# Altium PCB FMU3_REV_G.PcbDoc (part 3 of 4)
Units mm, origin at the board's own origin, x right, y up, seen from the top; angles counter-clockwise.
Board outline 34.01 x 34.03 mm, 8 copper layers (Top, GND_top, HorizontalTop, Verticall_top, Horizontal_bot, VerticalBot, GND_BOT, Bottom), stack 1.63 mm thick; 169 components, 248 nets, 852 pads, 426 vias.
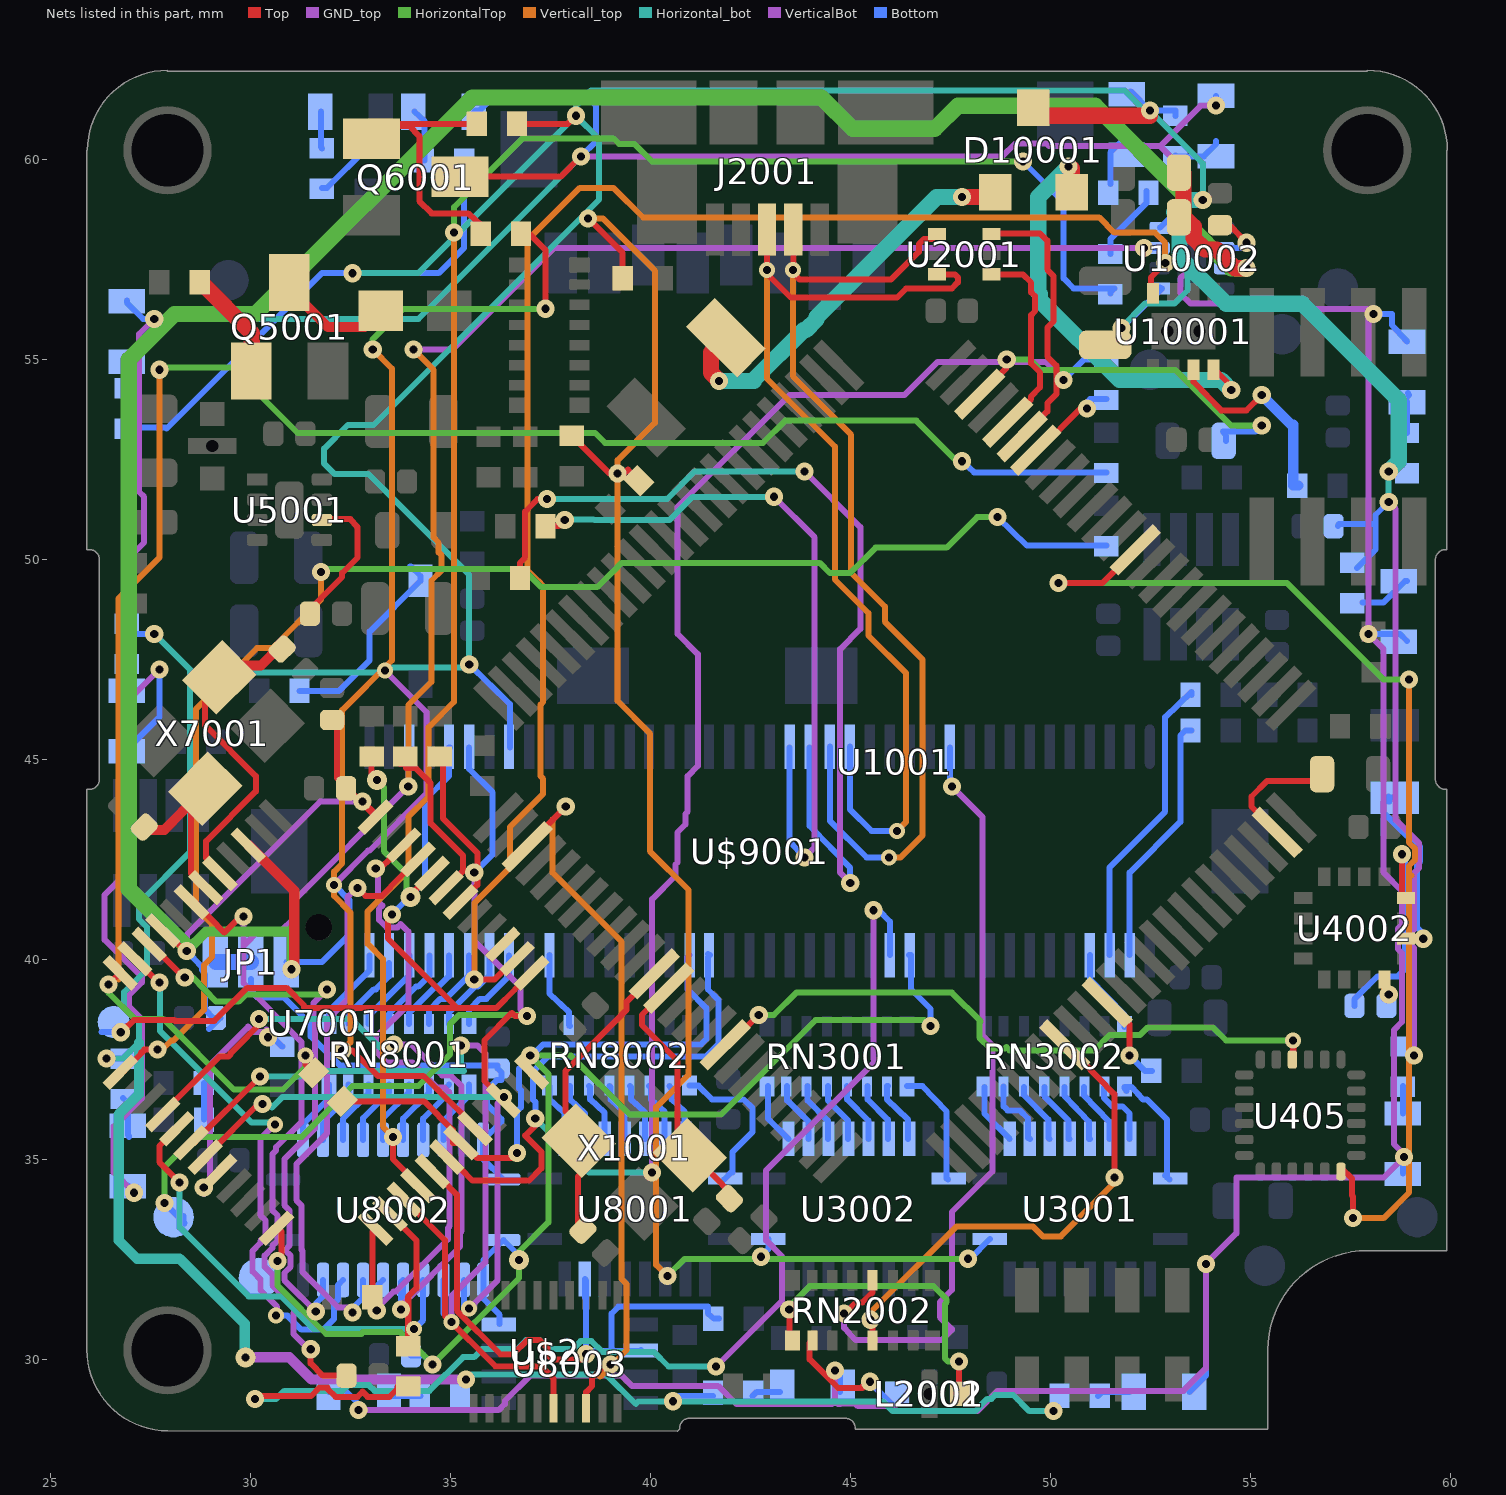
[diagram p9: the nets of this part, all layers, seen from the top]

## Via types
v1: diameter 0.453/0.453/0.453/0.453/0.453/0.453/0.453/0.453 (per signal layer), hole 0.203, Top to Bottom, tented both sides, 178 vias
v2: diameter 0.453/0.453/0.453/0.453 (per signal layer), hole 0.203, Top to Verticall_top, tented both sides, 116 vias
v3: diameter 0.453/0.453/0.453/0.453 (per signal layer), hole 0.203, Horizontal_bot to Bottom, tented both sides, 94 vias
v4: diameter 0.4, hole 0.2, Top to Verticall_top, tented both sides, 8 vias
v5: diameter 0.4, hole 0.2, Horizontal_bot to Bottom, tented both sides, 8 vias
v6: diameter 0.45, hole 0.2, Horizontal_bot to Bottom, tented bottom, 4 vias
v7: diameter 0.5, hole 0.2, Top to Verticall_top, tented both sides, 4 vias
v8: diameter 0.4, hole 0.2, Top to Bottom, tented bottom, 2 vias
v9: diameter 0.453/0.453/0.453/0.453/0.453/0.453/0.453/0.453 (per signal layer), hole 0.203, Top to Bottom, tented top, 2 vias
v10: diameter 0.5, hole 0.2, Horizontal_bot to Bottom, tented both sides, 2 vias
v11: diameter 0.453/0.453/0.453/0.453 (per signal layer), hole 0.203, Horizontal_bot to Bottom, tented bottom, 1 vias
v12: diameter 0.45, hole 0.2, Top to Verticall_top, tented top, 1 vias
v13: diameter 0/0/0/0/0/0 (per signal layer), hole 0.66, HorizontalTop to Bottom, tented bottom, 1 vias
v14: diameter 0.5, hole 0.2, Top to Bottom, tented both sides, 1 vias
v15: diameter 0.4, hole 0.2, Top to Bottom, tented both sides, 1 vias
v16: diameter 0.453/0.453/0.453/0.453/0.453/0.453/0.453/0.453 (per signal layer), hole 0.203, Top to Bottom, tented bottom, 1 vias
v17: diameter 0.453/0.453/0.453/0.453 (per signal layer), hole 0.203, Top to Verticall_top, tented top, 1 vias
v18: diameter 0.5, hole 0.2, HorizontalTop to Bottom, tented both sides, 1 vias

## Nets (pads, with @x,y where several pads share a name; then routed paths per layer and width w, separated by ;. In a path a pad name is that pad's centre, name@x,y a point inside that pad or via, vN(x,y) a via of type N, cw(c..) or ccw(c..) an arc to the next point about the centre after c; other vN are vias at no path point) (continued)
I2C_1_SCL: R3007.P$2 U$9001.37 | length 18.5
  Top w0.15: R3007.P$2@37.363,50.825 37.694,50.825 v1(37.846,50.978)
  Horizontal_bot w0.15: v1(37.846,50.978) 37.867,50.999 38.567,50.999 38.588,50.978 40.462,50.978 41.046,51.562 v3(43.078,51.562)
  VerticalBot w0.15: v3(43.078,51.562) 44.094,50.546 44.094,42.799 v3(43.84,42.545)
  Bottom w0.15: U$9001.37@43.459,45.288 43.459,42.951 v3(43.84,42.545)
I2C_1_SDA: R3008.P$2 U$9001.35 | length 24.1
  Top w0.15: R3008.P$2@36.728,49.53 36.728,49.911 36.855,50.038 36.855,51.156 36.855,51.194 37.168,51.507 v1(37.401,51.507)
  Horizontal_bot w0.15: v1(37.401,51.507) 40.407,51.507 41.097,52.197 42.266,52.197 v3(43.84,52.197)
  VerticalBot w0.15: v3(43.84,52.197) 45.237,50.8 45.237,48.26 44.729,47.752 44.729,42.164 v3(44.983,41.91)
  Bottom w0.15: U$9001.35@43.967,45.288 43.967,43.332 44.983,42.291 v3(44.983,41.91)
I2C_2_SCL: R3005.P$2 U$9001.6 | length 7.5
  Bottom w0.15: U$9001.6@51.46,40.107 51.46,42.291 52.857,43.688 52.857,46.05 53.518,46.685 R3005.P$2@53.518,46.609
I2C_2_SDA: R3006.P$2 U$9001.4 | length 6.3
  Bottom w0.15: U$9001.4@51.968,40.107 51.968,42.164 53.238,43.434 53.238,45.593 53.365,45.72 R3006.P$2@53.518,45.72
I/O_POWER_BREATHING: R6001.P$2 U7001.32 | length 29.9
  Top w0.15: v2(32.283,37.719) 32.537,37.719 33.172,37.084 34.315,37.084 35.611,35.814 U7001.32@35.611,35.789 ; R6001.P$2@36.754,58.141 36.957,58.141 37.363,57.734 v2(37.363,56.261)
  HorizontalTop w0.15: v2(33.045,55.245) 33.045,55.499 33.807,56.261 v2(37.363,56.261)
  Verticall_top w0.15: v2(32.283,37.719) 32.487,37.922 32.487,41.173 32.08,41.58 32.08,42.189 32.283,42.393 32.283,46.228 33.528,47.473 33.528,54.762 v2(33.045,55.245)
I\O\-\L\E\D\_\A\M\B\E\R\: R6015.P$1 U7001.28 | length 45.9
  Top w0.15: v2(33.553,35.56) 33.553,35.001 U7001.28@34.188,34.366
  HorizontalTop w0.15: v2(35.077,58.166) 35.077,58.801 36.8,60.524 39.064,60.524 39.208,60.38 39.583,60.38 39.589,60.386 40.03,59.944 v1(49.301,59.944)
  Verticall_top w0.15: v2(33.553,35.56) 33.299,35.814 33.299,40.005 32.918,40.386 32.918,41.199 33.934,42.215 33.934,43.561 34.442,44.069 34.442,45.802 35.077,46.437 v2(35.077,58.166)
  Bottom w0.15: v1(49.301,59.944) 50.317,58.928 50.317,57.023 50.571,56.769 51.587,56.769 51.486,56.667 R6015.P$1@51.486,56.642
I\O\-\L\E\D\_\S\A\F\E\T\_\P\R\O\T\: R6016.P$1 U$9001.28 | length 31.8
  Top w0.152: v1(30.099,29.007) 30.173,29.081 31.505,29.081 31.714,29.29 31.911,29.29 31.911,29.267 32.118,29.06 32.665,29.06 32.791,29.187 32.918,29.06 33.465,29.06 33.672,29.267 33.672,29.32 R6016.P$1@33.934,29.32
  Horizontal_bot w0.15: v1(30.099,29.007) 30.632,29.007 30.836,29.21 32.286,29.21 32.43,29.354 32.949,29.354 33.093,29.21 34.462,29.21 35.304,30.052 35.583,30.052 35.783,30.251 36.655,30.251 36.881,30.478 37.22,30.478 37.446,30.251 38.045,30.251 38.244,30.451 38.515,30.451 38.781,30.185 40.074,30.185 40.44,29.82 v3(41.631,29.82)
  VerticalBot w0.15: v3(41.631,29.82) 43.277,31.466 43.277,32.573 42.88,32.97 42.88,34.721 45.618,37.46 45.568,37.51 v3(45.568,41.224)
  Bottom w0.15: v3(45.568,41.224) 45.695,41.224 45.974,40.945 U$9001.28@45.974,40.107
I\O\-\L\E\D\_\S\A\F\E\T\Y\: R6016.P$2 U7001.26 | length 3.7
  Top w0.15: U7001.26@33.475,33.68 U7001.26@33.477,33.68
  Top w0.152: U7001.26@33.475,33.635 34.138,32.973 34.138,31.775 33.934,31.572 R6016.P$2@33.934,30.328
IMU_TEMPERATURE_CONTROL: U7001.27 U$2.9 | length 7.4
  Top w0.15: U7001.27@33.835,33.994 34.849,32.98 34.849,31.088 36.115,29.822 37.265,29.822 37.435,29.652 37.435,29.646 37.567,29.515 U$2.9@37.567,28.776
IO-!RESET: C7001.P$2 U7001.7 U10002.3 U$9001.75 | length 54.4
  Top w0.15: U7001.7@28.524,41.453 28.524,41.377 28.651,41.377 29.337,40.665 29.743,41.072 v1(29.82,41.072) ; v1(31.496,30.251) 31.496,29.896 31.801,29.591 C7001.P$2@32.309,29.591
  Verticall_top w0.15: v16@33.934,44.298 33.934,46.355 34.514,46.935 34.514,49.469 34.768,49.723 34.768,50.099 34.696,50.17 34.696,50.419 34.569,50.546 34.569,54.737 v1(34.061,55.245)
  VerticalBot w0.15: v1(29.82,41.072) 29.82,40.341 30.201,40.722 30.769,40.722 31.041,40.994 31.041,41.429 v16(33.934,44.323) ; v1(31.496,30.251) 31.445,30.251 31.069,30.628 31.069,31.15 31.087,31.169 31.087,31.303 30.536,31.854 30.536,32.124 30.342,32.317 30.342,32.587 30.536,32.781 30.536,32.835 30.67,32.97 30.67,33.592 30.536,33.727 30.536,35.125 30.632,35.222 30.632,35.306 31.267,35.941 31.267,37.928 29.816,39.405 29.82,39.827 ; v1(34.061,55.245) 35.043,55.245 37.583,57.785 v3(52.324,57.785) ; 29.82,39.827 29.81,40.35 29.81,39.837 29.82,39.827
  Bottom w0.15: v16(33.934,44.323) 33.934,45.263 U$9001.75@33.96,45.288 ; v3(52.324,57.785) U10002.3@52.73,57.785
IO-!VDD_SERVO_IN_FAULT: U7001.38 U10001.4 | length 39.2
  Top w0.15: v2(35.585,39.497) 36.093,39.497 36.627,40.03 U7001.38@36.652,40.03 ; U10001.4@52.578,56.667 52.502,56.744 52.502,57.048 v2(52.857,57.404)
  Verticall_top w0.15: v2(35.585,39.497) 35.585,41.402 36.474,42.291 36.474,43.302 37.308,44.135 37.308,44.511 37.243,44.576 37.243,46.366 37.308,46.431 37.308,49.331 37.181,49.458 37.176,49.458 36.911,49.723 36.911,57.972 38.225,59.286 39.062,59.286 39.802,58.547 47.777,58.547 51.206,58.547 51.587,58.166 52.603,58.166 52.857,57.912 v2(52.857,57.404)
IO-BOOT0: R7001.P$1 U7001.44 | length 5.2
  Top w0.15: R7001.P$1@33.02,45.068 33.02,44.399 33.147,44.526 v7(33.147,44.475) ; v7(33.985,41.554) 33.985,41.599 U7001.44@34.529,42.143
  HorizontalTop w0.15: v7(33.147,44.475) 33.325,44.298 33.325,42.703 33.886,42.141 33.886,41.455 v7(33.985,41.554)
IO-BOOT1: R7002.P$1 U7001.20 | length 6.6
  Top w0.15: v1(28.823,34.292) 28.823,34.309 U7001.20@29.235,34.722
  VerticalBot w0.15: v1@28.823,34.131 v1(28.823,34.292) ; v1@28.911,34.22 28.981,34.29 28.981,37.363 29.932,38.314 30.065,38.18 30.336,38.18 30.393,38.237 30.429,38.202 v3(30.429,38.049)
  Bottom w0.15: v3(30.429,38.049) 30.497,38.117 30.48,38.117 R7002.P$1@30.785,37.813
IO-CH1: U7001.10 U8002.10 | length 15.3
  Top w0.15: U7001.10@27.483,40.386 28.346,39.522 v2(28.346,39.548)
  HorizontalTop w0.15: v2(28.346,39.548) 28.55,39.548 29.134,38.938 29.693,38.938 29.87,39.116 31.775,39.116 v1(31.902,39.243)
  VerticalBot w0.15: v3@31.715,31.099 30.836,31.979 30.836,32.157 30.995,32.317 30.995,32.587 30.854,32.729 30.97,32.846 30.97,33.717 30.836,33.851 30.836,35.001 31.598,35.764 31.598,38.474 31.567,38.505 31.567,38.908 v1(31.902,39.243)
  Bottom w0.15: v3(31.623,31.191) 31.623,31.394 31.803,31.575 U8002.10@31.803,31.981
IO-CH1-PROT: RN8001.9 U$9001.80 | length 2.1
  Bottom w0.15: RN8001.9@31.953,38.379 31.953,38.71 32.969,39.726 U$9001.80@32.969,40.097
IO-CH2: U7001.11 U8002.9 | length 14.2
  Top w0.15: U7001.11@27.127,40.03 27.127,39.98 27.686,39.421 v1(27.711,39.421)
  Horizontal_bot w0.15: v1(27.711,39.421) 27.732,39.4 27.732,38.202 30.019,35.916 30.632,35.916 30.632,35.907 v5(30.597,35.872)
  VerticalBot w0.15: v5(30.597,35.872) 30.236,35.51 30.236,33.603 30.37,33.468 30.37,33.094 30.236,32.959 30.236,32.905 30.042,32.712 30.042,32.193 30.236,31.999 30.236,31.73 30.658,31.308 30.658,31.115 v5(30.632,31.09)
  Bottom w0.15: v5(30.632,31.09) 30.912,31.09 31.263,30.738 31.811,30.738 32.076,31.004 32.076,31.379 32.068,31.386 32.182,31.5 32.182,31.86 U8002.9@32.303,31.981
IO-CH2-PROT: RN8001.10 U$9001.78 | length 2
  Bottom w0.15: RN8001.10@32.436,38.379 32.436,38.608 33.073,39.245 33.123,39.245 33.452,39.574 U$9001.78@33.452,39.903
IO-CH3: U7001.45 U8002.8 | length 15
  Top w0.15: v1(32.664,41.783) 32.868,41.58 33.274,41.58 U7001.45@34.188,42.52
  VerticalBot w0.15: v3(32.537,31.166) 32.41,31.293 32.182,31.293 31.295,32.179 31.295,32.712 31.27,32.737 31.27,33.841 31.136,33.976 31.136,34.877 31.898,35.64 31.898,38.477 32.41,38.989 32.41,41.554 v1(32.664,41.783)
  Bottom w0.15: v3@32.569,31.166 32.569,31.134 v3(32.537,31.166) 32.537,31.255 32.569,31.286 32.563,31.293 32.803,31.533 U8002.8@32.803,31.981
IO-CH3-PROT: RN8001.11 U$9001.76 | length 2.1
  Bottom w0.15: RN8001.11@32.944,38.379 32.944,38.584 33.96,39.6 U$9001.76@33.96,40.097
IO-CH4: U7001.46 U8002.7 | length 15.9
  Top w0.15: v1(33.122,42.266) 33.223,42.266 U7001.46@33.833,42.85
  VerticalBot w0.15: v1(33.122,42.266) 33.172,42.189 33.172,41.453 33.284,41.341 33.201,41.258 33.201,40.987 33.393,40.796 33.663,40.796 33.746,40.879 33.934,40.691 33.934,38.866 33.127,38.058 33.127,37.684 33.392,37.42 34.034,37.42 34.66,36.794 34.834,36.794 34.97,36.658 34.97,33.325 34.926,33.282 34.926,32.996 33.624,31.694 33.57,31.694 33.147,31.271 v3(33.147,31.217)
  Bottom w0.15: v3(33.147,31.217) 33.147,31.466 33.182,31.5 33.182,31.86 U8002.7@33.303,31.981
IO-CH4-PROT: RN8001.12 U$9001.74 | length 2.2
  Bottom w0.15: RN8001.12@33.452,38.379 33.452,38.636 34.128,39.312 34.18,39.312 34.468,39.6 U$9001.74@34.468,40.097
IO-CH5: U7001.16 U8002.6 | length 16.8
  Top w0.15: U7001.16@27.813,36.144 27.813,36.17 29.21,37.567 29.439,37.567 29.492,37.62 29.492,37.652 30.347,38.506 v1(30.201,38.506)
  Horizontal_bot w0.15: v1(30.201,38.506) 32.461,38.506 32.487,38.532 33.223,37.795 ; 33.198,37.821 33.249,37.871 v3(33.579,37.871)
  VerticalBot w0.15: v3(33.579,37.871) 34.007,37.871 34.784,37.094 34.998,37.094 35.27,36.823 35.27,33.201 35.226,33.158 35.226,32.813 v3@33.817,31.404
  Bottom w0.15: v3(33.757,31.242) 33.757,31.934 U8002.6@33.803,31.981 33.803,31.547
IO-CH5-PROT: RN8001.13 U$9001.72 | length 2.2
  Bottom w0.15: RN8001.13@33.956,38.379 33.956,38.66 34.608,39.312 34.688,39.312 34.95,39.574 U$9001.72@34.95,40.097
IO-CH6: U7001.17 U8002.5 | length 11.3
  Top w0.15: U7001.17@28.169,35.789 27.711,35.331 27.711,34.925 v1(28.219,34.417)
  Horizontal_bot w0.152: v1(28.219,34.417) 28.219,33.299 29.947,31.572 30.753,31.572 31.571,30.754 v5(34.084,30.754) v5@34.039,30.709
  Bottom w0.152: v5(34.084,30.754) 34.053,30.785 34.112,30.785 34.307,30.98 U8002.5@34.307,31.981
IO-CH6-PROT: RN8001.14 U$9001.70 | length 2.2
  Bottom w0.15: RN8001.14@34.456,38.379 34.456,38.732 34.733,39.01 34.869,39.01 35.458,39.6 U$9001.70@35.458,40.097
IO-CH7: U7001.18 U8002.4 | length 17.2
  Top w0.15: U7001.18@28.524,35.433 28.6,35.433 30.228,37.061 v1(30.228,37.072)
  Horizontal_bot w0.15: v1(30.228,37.072) 31.23,37.072 31.445,37.287 31.521,37.211 35.331,37.211 35.255,37.287 v3(35.255,37.846)
  VerticalBot w0.15: v5(35.018,30.93) 35.018,31.585 35.87,32.436 35.87,37.638 35.662,37.846 v3(35.255,37.846)
  Bottom w0.15: U8002.4@34.815,31.981 34.815,31.148 35.018,30.945 v5(35.018,30.93)
IO-CH7-PROT: RN8001.15 U$9001.68 | length 2.2
  Bottom w0.15: RN8001.15@34.956,38.379 34.956,38.708 34.994,38.708 35.599,39.312 35.679,39.312 35.966,39.6 U$9001.68@35.966,40.097
IO-CH8: U7001.19 U8002.3 | length 14.6
  Top w0.15: U7001.19@28.88,35.077 30.251,36.449 30.292,36.408 v1(30.292,36.382)
  Horizontal_bot w0.15: v1(30.292,36.382) 30.445,36.382 30.531,36.297 30.785,36.551 v5(36.322,36.551)
  VerticalBot w0.15: v5(35.458,31.267) 36.17,31.979 36.17,36.398 v5(36.322,36.551)
  Bottom w0.15: U8002.3@35.323,31.981 35.323,31.332 35.388,31.267 v5(35.458,31.267)
IO-CH8-PROT: RN8001.16 U$9001.66 | length 2.2
  Bottom w0.15: RN8001.16@35.456,38.379 35.456,38.742 35.724,39.01 35.885,39.01 36.449,39.574 U$9001.66@36.449,40.097
IO-SWCLK: IO-SWCLK.P$1 U7001.37 U$9001.71 | length 19.7
  Top w0.15: v1(26.746,38.176) 26.903,38.333 26.934,38.333 27.082,38.481 28.087,38.481 28.108,38.46 29.087,38.46 29.911,39.283 30.893,39.283 31.333,38.843 31.333,38.796 31.344,38.786 36.144,38.786 36.601,39.243 37.008,39.675 U7001.37@37.008,39.649 ; v1(33.528,41.123) 33.426,41.021 33.426,40.513 35.154,38.786
  Bottom w0.15: IO-SWCLK.P$1@26.264,38.176 v1(26.746,38.176) ; v1(33.528,41.123) 34.353,41.948 34.353,43.98 34.95,44.577 34.95,45.288 U$9001.71@34.976,45.288
IO-SWDIO: IO-SWDIO.P$1 U7001.34 U$9001.69 | length 23.7
  Top w0.15: U7001.34@36.297,36.5 35.839,36.957 35.839,37.973 36.525,38.659 36.601,38.583 v1(36.906,38.583)
  HorizontalTop w0.15: v1(27.838,33.909) 27.838,34.798 28.6,35.56 31.267,35.56 32.537,36.83 34.188,36.83 34.972,37.614 34.972,38.376 35.204,38.608 36.881,38.608 v1(36.906,38.583)
  VerticalBot w0.15: v3(35.585,42.164) 35.585,40.462 36.746,39.301 36.746,38.743 v1(36.906,38.583)
  Bottom w0.15: v1(27.838,33.909) 28.346,33.401 28.321,33.376 IO-SWDIO.P$1@28.321,33.579 ; U$9001.69@35.458,45.288 35.458,44.755 36.043,44.171 36.043,42.621 v3(35.585,42.164)
IO-SWO: U7001.39 | length 0.1
  Top w0.15: U7001.39@36.297,40.335 U7001.39@36.297,40.386
IO-USART1_RX_SPECTRUM_DSM: R7013.P$2 U7001.31 U$9001.48 | length 14.6
  Top w0.15: R7013.P$2@32.287,36.445 34.331,36.445 35.048,35.729 35.048,35.41 U7001.31@35.251,35.41 ; U7001.31@35.255,35.433 35.662,35.027 v1@36.652,35.027
  Bottom w0.15: v1@36.652,35.128 v1(36.652,35.154) 36.652,36.199 36.747,36.293 36.747,36.727 36.703,36.771 36.703,37.269 37.308,37.874 41.252,37.874 41.384,38.006 41.384,38.778 40.919,39.243 40.919,40.056 U$9001.48@40.97,40.107
IO-USART1_TX: R1001.P$2 U7001.30 U$9001.46 | length 46.2
  Top w0.15: U7001.30@34.9,35.077 34.95,35.077 35.535,34.468 36.957,34.468 37.262,34.773 37.262,35.184 36.858,35.588 37.109,35.839 v1(37.109,36.017)
  Horizontal_bot w0.15: v1(37.109,36.017) 38.456,34.671 v3(40.03,34.671)
  VerticalBot w0.15: v3(40.03,34.671) 40.03,41.504 40.615,42.088 40.615,42.367 40.665,42.418 40.665,43.175 40.864,43.373 40.864,43.633 40.919,43.688 40.919,44.577 41.173,44.831 41.173,47.625 40.665,48.133 40.665,51.308 43.459,54.102 46.336,54.102 47.17,54.936 49.865,54.936 v3(50.317,54.483)
  Bottom w0.15: v1(37.109,36.017) 37.109,36.433 37.048,36.494 37.048,37.19 37.43,37.571 41.377,37.571 41.687,37.881 41.687,38.984 41.427,39.243 41.427,40.056 41.478,40.107 U$9001.46@41.427,40.132 ; v3(50.317,54.483) 50.825,54.991 R1001.P$2@51.384,54.991
IO-VDD_3V3: C7002.P$1 C7003.P$1 C7006.P$1 C8001.P$1 C10004.P$1 C10005.P$1 IO-VDD_3V3.P$1 JP1.1 U7001.3 U7001.9 U7001.24 U7001.36 U7001.48 U8002.1 U8002.2 U8003.8 U10002.7 U$9001.26 | length 105.9
  Top w0.15: U7001.9@27.813,40.742 v1@28.397,40.157 ; v1(28.397,40.208) v1@28.397,40.157 ; v1@28.423,40.132 v1@28.397,40.157 ; U7001.24@30.658,33.325 30.759,33.198 30.759,32.543 v1(30.669,32.452) ; C7006.P$1@32.156,45.872 32.156,44.526 U7001.48@33.122,43.561 ; v1(32.791,43.942) U7001.48@33.122,43.637
  Top w0.254: U7001.3@29.947,42.85 31.085,41.711 31.085,39.823 v2(31.013,39.751)
  Top w0.406: C10004.P$1@53.238,58.649 53.571,58.316 53.571,58.024 53.852,57.743 54.144,57.743 54.61,57.277 v1(54.889,57.277) ; C10004.P$1@53.315,58.572 C10005.P$1@53.315,59.665
  GND_top w0.15: v1(28.397,40.208) v1@28.423,40.157
  HorizontalTop w0.15: v1(30.669,32.452) 30.669,31.841 31.877,30.632 32.762,30.632 32.808,30.678 33.737,30.678 v1(34.544,29.87) 36.703,32.029 v18(36.703,32.487) 36.703,32.69 37.437,33.424 37.437,37.137 v2(36.982,37.592) 37.998,37.592 39.472,36.119 41.758,36.119 44.12,38.481 46.838,38.481 v1(46.99,38.329)
  HorizontalTop w0.254: v1(28.397,40.208) 28.882,40.693 30.965,40.693 31.013,40.742 v2(31.013,39.751)
  HorizontalTop w0.406: v1(28.397,40.208) 28.397,40.31 26.949,41.758 26.949,54.991 28.092,56.134 30.124,56.134 35.532,61.542 44.266,61.542 45.049,60.759 47.099,60.759 47.678,61.339 51.107,61.339 53.315,59.131 53.315,58.471 54.508,57.277 v1(54.889,57.277)
  VerticalBot w0.15: v1(28.397,40.208) 28.397,40.61 31.729,43.942 v1(32.791,43.942)
  Bottom w0.15: v1(28.397,40.208) 28.778,39.802 28.778,39.726 28.854,39.624 28.854,38.735 29.058,38.532 29.235,38.532 C7002.P$1@28.959,38.255 ; U8003.8@36.22,30.886 36.22,31.108 35.814,31.515 35.814,32.481 U8002.1@36.314,32.981 36.703,32.592 v18(36.703,32.487) ; U$9001.26@46.457,40.107 46.507,40.107 46.507,39.243 46.99,38.76 v1(46.99,38.329) ; U10002.7@54.331,57.302 54.915,57.302 v1(54.889,57.277)
  Bottom w0.152: C8001.P$1@34.004,30.099 34.315,30.099 v1(34.544,29.87)
IO-VDD_5V5: C10001.P$1 C10002.P$1 D10001.3 JP1.3 LED6011.A R1.P$2 R2.P$2 R6002.P$2 R6003.P$2 R6004.P$2 R6005.P$2 R6006.P$2 R6007.P$2 R6008.P$2 R6009.P$2 R6010.P$2 R6011.P$2 U10002.1 U10002.4 U$9001.65 | length 164.3
  Top w0.15: R6002.P$2@36.652,60.884 37.922,60.884 v1(38.125,61.087) ; D10001.3@49.555,61.087 D10001.3@49.555,61.29
  Top w0.406: D10001.3@49.555,61.087 52.476,61.087 v1(52.476,61.214)
  Horizontal_bot w0.15: v3(26.391,37.516) 26.797,37.516 27.203,37.922 27.203,38.501 27.194,38.511 27.092,38.511 26.827,38.776 26.827,39.177 27.402,39.752 27.402,40.801 27.203,41 27.203,41.402 28.473,42.672 28.473,47.244 v1(27.584,48.133) 28.545,47.172 33.35,47.172 33.473,47.295 35.382,47.295 v3(35.458,47.371) 35.458,49.612 32.945,52.125 32.096,52.125 31.831,52.39 31.831,52.766 32.422,53.357 33.067,53.357 38.705,58.994 38.705,60.507 v1(38.125,61.087) ; v3(32.537,57.15) 34.188,57.15 v1(38.125,61.087) ; v3(35.382,29.489) 35.509,29.616 38.887,29.616 39.624,28.88 39.693,28.949 v3(40.556,28.949) 45.796,28.949 46.041,28.704 48.108,28.704 48.412,29.009 48.51,29.009 48.607,29.106 49.055,29.106 49.459,28.702 v3(50.063,28.702) ; v1(51.765,55.778) 51.765,55.804 52.349,56.388 53.086,56.388 53.416,56.718 53.416,57.328 ; v3(53.797,58.979) 53.797,59.893 v1(52.476,61.214) 52.349,61.214 51.841,61.722 38.506,61.722 38.125,61.341 v1(38.125,61.087) ; v3(58.445,51.435) v3(58.445,52.197)
  Horizontal_bot w0.254: 27.203,37.922 27.203,36.627 26.698,36.121 26.698,32.967 27.153,32.512 28.219,32.512 29.845,30.886 29.845,30.023 v10(29.87,30.048)
  Horizontal_bot w0.406: v3(53.797,58.979) 53.391,58.979 53.086,58.674 53.213,58.547 53.213,57.556 54.381,56.388 56.286,56.388 58.699,53.975 58.699,52.451 v3(58.445,52.197)
  VerticalBot w0.15: v3(58.445,51.435) 58.621,51.26 58.621,43.487 59.205,42.903 59.205,42.282 59.08,42.158 59.08,40.748 58.981,40.649 58.981,40.377 59.08,40.278 v3(59.08,37.592)
  VerticalBot w0.152: v5(32.08,41.859) 32.08,41.865 32.934,42.718 32.97,42.718 34.387,44.135 34.387,46.182 v5(33.35,47.219)
  VerticalBot w0.254: v10(29.87,30.048) 30.963,30.048 31.521,29.489 v3(35.382,29.489)
  Bottom w0.15: R6010.P$2@26.899,48.387 26.822,48.387 27.076,48.133 v1(27.584,48.133) ; R6011.P$2@26.899,53.289 27.864,53.289 27.889,53.264 31.775,57.15 v3(32.537,57.15) 34.696,57.15 35.331,57.785 R2.P$2@35.331,59.969 ; v3(35.458,47.371) 36.474,46.38 U$9001.65@36.474,45.288 ; v3(40.556,28.949) 40.691,29.083 R6007.P$2@41.554,29.083 ; v1(51.765,55.778) 52.781,56.769 U10002.1@52.705,56.769 ; LED6011.A@51.994,61.697 v1(52.476,61.214) 53.111,61.214 R1.P$2@53.111,61.087 ; U10002.1@52.603,56.769 U10002.1@52.705,56.769 ; U10002.1@52.73,56.794 U10002.1@52.705,56.769 ; U10002.4@52.73,58.293 53.416,58.979 v3(53.797,58.979) ; C10002.P$1@57.175,50.825 57.201,50.876 58.115,50.876 ; R6004.P$2@57.658,49.784 58.115,50.241 58.115,50.876 ; v3(58.445,51.435) 58.115,51.105 58.115,50.876
  Bottom w0.152: JP1.3@30.886,39.929 31.775,39.929 32.461,40.615 32.461,41.478 v5(32.08,41.859)
"LEVEL_SHIFT ENABLE": R1020.P$1 R1021.P$2 R1022.P$2 U3001.10 U3002.10 | length 42
  Top w0.15: R1021.P$2@38.024,53.086 38.964,52.146 v1(39.167,52.146) 39.328,52.146 39.423,52.241 R1020.P$1@39.698,51.966 ; v12(38.43,58.522) 39.294,57.658 R1022.P$2@39.294,57.023
  HorizontalTop w0.15: v2(40.411,32.08) 40.843,32.512 v9(47.93,32.512)
  Verticall_top w0.15: v12(38.43,58.522) 38.8,58.522 40.101,57.221 40.101,53.411 39.167,52.476 v1(39.167,52.146) 39.167,46.456 39.976,45.646 39.976,42.701 40.941,41.736 40.941,37.109 40.132,36.3 40.132,32.36 v2(40.411,32.08)
  Bottom w0.15: v9(42.748,32.563) 42.937,32.751 U3002.10@42.937,33.007 ; v9(47.93,32.512) 47.979,32.512 U3001.10@48.474,33.007
M\P\U\_\C\S\: U405.22 U1001.17 | length 16.6
  Top w0.15: U1001.17@41.859,37.871 41.961,37.871 v2(42.697,38.608)
  Top w0.152: U405.22@56.036,37.415 56.058,37.438 v4(56.058,37.973)
  HorizontalTop w0.15: v2(42.697,38.608) 43.078,38.608 43.637,39.167 47.523,39.167 48.245,38.446 48.214,38.415 48.214,38.039 48.479,37.774 48.854,37.774 48.885,37.805 48.971,37.719 51.079,37.719 51.46,38.1 52.222,38.1 52.422,38.3 54.051,38.3 54.378,37.973 v4(56.058,37.973)
M\P\U\_\E\X\T\_\C\S\: U1001.3 U$2.5 | length 18.7
  Top w0.15: U1001.3@36.932,42.824 36.932,42.875 v2(37.871,43.815) ; U$2.5@38.379,28.778 38.379,29.179 38.527,29.327 38.527,29.523 38.875,29.87 v2(38.989,29.87)
  Verticall_top w0.15: v2(37.871,43.815) 37.546,43.489 37.546,42.16 39.268,40.437 39.268,32.004 39.395,31.877 39.395,30.231 38.73,29.566 38.659,29.636 38.893,29.87 v2(38.989,29.87)
MPU_DRDY: U405.12 U1001.62 | length 28.1
  Top w0.15: v1(50.19,49.403) 51.283,49.403 U1001.62@52.121,50.241 ; 57.531,34.112 57.539,34.097 57.556,34.061 v2(57.556,33.528)
  Top w0.152: U405.12@57.252,34.793 57.531,34.514 57.531,34.112 57.531,34.093
  HorizontalTop w0.15: v1(50.19,49.403) 55.905,49.403 58.318,46.99 v2(58.953,46.99)
  Verticall_top w0.15: v2(57.556,33.528) 58.318,33.528 58.953,34.163 58.953,42.09 59.013,42.09 58.953,42.15 58.953,42.337 59.106,42.49 59.106,42.761 58.953,42.914 v2(58.953,46.99)
NetC1002_P$1: C1002.P$1 U1001.12 X1001.3 | length 7.5
  Top w0.15: C1002.P$1@38.252,33.299 38.176,33.35 38.176,34.569 38.227,34.62 38.227,35.458 38.202,35.484 38.202,35.89 37.871,36.195 37.871,37.211 39.395,38.735 39.395,38.938 U1001.12@40.107,39.649
NetC1003_P$2: C1003.P$2 U1001.13 X1001.1 | length 6.5
  Top w0.15: U1001.13@40.462,39.294 39.776,38.608 39.776,38.354 40.665,37.465 40.665,35.56 40.97,35.281 40.97,35.128 40.996,35.128 41.046,35.128 42.037,34.112 C1003.P$2@42.037,34.087
NetC4007_P$1: C4007.P$1 U4002.12 | length 5.8
  Top w0.15: v1(58.778,42.626) 58.778,41.653 58.877,41.554 58.852,41.529 U4002.12@58.877,41.529
  Bottom w0.15: C4007.P$1@57.588,38.837 57.588,38.995 58.166,39.573 58.674,39.573 58.852,39.751 58.852,42.552 v1(58.778,42.626)
NetC4007_P$2: C4007.P$2 U4002.8 | length 0.6
  Top w0.15: U4002.8@58.344,39.497 58.344,39.218 v1(58.445,39.116)
  Bottom w0.15: C4007.P$2@58.318,39.116 v1(58.445,39.116) C4007.P$2@58.471,39.116
NetC4008_1: C4008.1 U4002.10 | length 5
  Top w0.15: U4002.10@58.826,40.513 v1(59.309,40.513)
  Bottom w0.15: C4008.1@58.471,43.942 58.445,43.942 C4008.1@58.445,44.018 ; C4008.1@58.598,44.044 58.471,44.044 C4008.1@58.445,44.018 ; v1@59.436,40.513 59.154,40.795 59.154,42.361 59.231,42.438 59.231,42.813 58.966,43.078 58.903,43.078 58.318,43.663 58.318,43.942 58.445,44.069 C4008.1@58.445,44.018
NetC5003_P$2: C5003.P$2 U5001.6 | length 3.6
  Top w0.15: C5003.P$2@31.477,48.641 31.477,48.749 32.283,49.555 32.283,49.657 32.664,50.038 32.664,50.8 32.487,51.003 U5001.6@31.775,51.003
NetC5013_P$1: C5013.P$1 U1001.49 | length 3.1
  Top w0.15: U1001.49@55.651,43.18 55.651,43.205 55.016,43.815 55.016,44.069 55.397,44.45 56.566,44.45 C5013.P$1@56.744,44.628
NetC5016_P$1: C5016.P$1 U1001.73 | length 9.5
  Top w0.15: U1001.73@48.235,54.127 48.895,54.788 v2(48.895,54.991)
  HorizontalTop w0.15: v2(48.895,54.991) 49.479,54.991 49.733,54.737 53.111,54.737 54.508,53.34 v1(55.27,53.34)
  Bottom w0.15: C5016.P$1@54.381,52.959 54.381,53.086 54.305,53.188 55.118,53.188 v1(55.27,53.34)
NetC7004_P$1: C7004.P$1 U7001.5 X7001.3 | length 8.1
  Top w0.15: X7001.3@29.21,47.041 28.854,46.685 28.854,45.847 30.124,44.577 30.124,44.196 28.88,42.951 28.88,42.527 29.235,42.189 U7001.5@29.235,42.164
  Top w0.254: X7001.3@29.21,47.041 29.53,47.346 30.251,47.346 C7004.P$1@30.734,47.828
NetC7005_P$2: C7005.P$2 U7001.6 X7001.1 | length 4.7
  Top w0.15: X7001.1@28.727,44.196 X7001.1@28.727,44.145 ; U7001.6@28.88,41.808 28.854,41.808 28.499,42.146 28.499,43.917 X7001.1@28.727,44.145 ; X7001.1@28.905,44.298 28.88,44.298 28.829,44.323 28.829,44.298 28.88,44.272 X7001.1@28.727,44.145
  Top w0.254: C7005.P$2@27.407,43.231 27.838,43.231 X7001.1@28.727,44.145
NetC8003_P$1: C8003.P$1 JP1.2 U8002.23 U8002.24 | length 11.1
  Bottom w0.15: JP1.2@29.997,39.504 29.997,39.218 30.175,39.04 30.836,39.04 31.496,38.379 31.496,38.074 32.224,37.346 36.17,37.346 C8003.P$1@36.17,37.268 36.264,37.173 36.264,36.976 36.146,36.976 35.897,36.727 35.897,36.375 36.264,36.007 36.264,35.942 U8002.23@35.806,35.484 35.806,35.001 U8002.24@36.314,34.493
NetC10003_P$1: C10003.P$1 U10002.6 | length 1.7
  Top w0.15: C10003.P$1@54.229,58.268 54.28,58.318 54.508,58.318 v1(54.889,57.912)
  Bottom w0.15: U10002.6@54.331,57.785 54.762,57.785 v1(54.889,57.912) 54.889,57.785 v1@54.813,57.785
NetD5001_C: D5001.C R5005.P$2 | length 5.1
  Bottom w0.15: R5005.P$2@31.217,46.711 32.207,46.711 32.969,47.473 32.969,48.189 D5001.C@34.239,49.459 34.239,49.581 34.005,49.815 D5001.C@33.976,49.815
NetD10001_1: D10001.1 F10001.2 | length 10.3
  Top w0.15: D10001.1@48.438,59.055 48.565,59.182 D10001.1@48.616,59.182
  Top w0.406: v1(41.707,54.458) 41.504,54.661 41.504,55.169 F10001.2@41.874,55.54 ; v1(47.777,59.055) 48.438,59.055 D10001.1@48.438,58.979
  Horizontal_bot w0.406: v1(41.707,54.458) 42.579,54.458 42.562,54.474 43.817,55.73 43.876,55.73 44.143,55.996 44.143,56.055 47.142,59.055 v1(47.777,59.055)
NetD10001_2: D10001.2 U10001.8 | length 10.8
  Top w0.15: U10001.8@54.077,54.762 54.508,54.331 v1(54.508,54.229)
  Top w0.406: v1(50.444,59.817) 50.521,59.766 D10001.2@50.521,59.182
  Horizontal_bot w0.406: v1(50.444,59.817) 49.682,59.055 49.682,56.675 49.729,56.628 49.729,56.469 51.714,54.483 54.254,54.483 v1(54.508,54.229)
NetL2001_P$2: L2001.P$2 RN2002.1 | length 7.9
  Top w0.15: v2(43.459,31.242) 43.459,30.556 RN2002.1@43.561,30.48 ; v2(47.701,29.947) 47.701,29.21 L2001.P$2@47.777,29.134
  HorizontalTop w0.15: v2(43.459,31.242) 43.459,31.318 43.967,31.826 47.066,31.826 47.396,31.496 47.396,31.426 47.348,31.378 47.348,30.02 47.422,29.947 v2(47.701,29.947)
NetL2002_P$2: L2002.P$2 RN2002.2 | length 3.2
  Top w0.15: RN2002.2@44.044,30.48 43.967,30.404 43.967,29.997 44.679,29.286 45.288,29.286 45.288,29.312 45.415,29.439 v1(45.475,29.439)
  Bottom w0.15: v1(45.475,29.439) 45.475,29.43 L2002.P$2@46.025,28.88
NetLED1_A: LED1.A R1.P$1 | length 1.2
  Bottom w0.15: R1.P$1@53.111,60.096 53.137,60.071 53.823,60.071 54.127,60.376 54.127,60.452
NetLED1_C: LED1.C LED2.C LED6001.C LED6002.C LED6003.C LED6004.C LED6005.C LED6006.C LED6007.C LED6008.C LED6009.C Q6001.3 | length 136.7
  Top w0.15: Q6001.3@35.23,59.563 37.744,59.563 v1(38.252,60.071)
  Horizontal_bot w0.15: v3(27.584,56.007) 34.188,56.007 v1(38.252,60.071)
  VerticalBot w0.15: v1(27.076,34.163) 26.568,34.671 26.568,35.814 27.277,36.523 27.277,38.502 26.952,38.828 26.952,39.099 27.277,39.425 27.277,39.55 26.344,40.483 26.344,41.61 26.822,42.088 26.822,46.355 ; v3(27.584,56.007) 27.203,55.626 27.203,51.689 27.33,51.562 27.33,50.419 26.822,49.911 26.822,46.355 ; v3(27.711,47.244) 26.822,46.355 ; v1(32.69,28.727) 36.195,28.727 36.347,28.88 36.347,28.956 36.982,29.591 39.268,29.591 39.522,29.337 41.681,29.337 42.141,28.877 44.524,28.877 44.602,28.956 ; v1(38.252,60.071) 48.788,60.071 49.114,60.397 49.885,60.397 49.956,60.325 52.73,60.325 ; v3(44.602,29.718) 44.602,28.956 ; v3(54.127,61.341) 53.746,61.341 52.73,60.325 ; 44.602,28.956 44.681,28.877 44.739,28.877 44.751,28.889 45.113,28.889 45.173,28.829 46.035,28.829 46.16,28.704 48.161,28.704 48.666,29.21 53.311,29.21 53.873,29.773 v3(53.873,32.385) 54.635,33.147 54.635,34.544 58.318,34.544 v3(58.826,35.052) 58.826,35.128 58.572,35.382 58.572,38.227 58.778,38.433 58.778,40.153 58.679,40.252 58.679,40.774 58.778,40.873 58.778,41.704 58.318,42.164 58.318,47.752 v3(57.937,48.133) 57.937,56.007 v3(58.064,56.134) 57.937,56.261 55.397,56.261 55.27,56.388 53.492,56.388 53.238,56.642 53.238,57.023 53.365,57.15 53.365,57.785 53.238,57.912 53.238,59.817 52.73,60.325
  Bottom w0.15: LED6008.C@26.899,45.212 26.899,45.237 27.711,46.05 v3(27.711,47.244) ; LED6009.C@26.899,56.464 26.899,56.413 27.305,56.007 v3(27.584,56.007) ; LED6007.C@26.924,34.341 v1(27.076,34.163) ; LED6006.C@31.953,29.185 32.385,29.185 32.69,28.88 v1(32.69,28.727) ; LED2.C@35.585,61.189 35.611,61.214 35.712,61.214 36.093,61.595 38.379,61.595 38.633,61.341 38.633,60.452 v1(38.252,60.071) ; v3(44.602,29.718) 44.729,29.616 LED6005.C@44.729,29.185 ; LED6004.C@53.467,29.185 53.873,29.591 v3(53.873,32.385) ; v3(54.127,61.341) LED1.C@54.127,61.583 ; v3(57.937,48.133) 58.725,48.133 LED6002.C@58.903,47.955 ; v3(58.064,56.134) 58.522,56.134 58.522,55.855 LED6001.C@58.903,55.448 ; LED6003.C@58.801,34.646 58.801,35.027 v3(58.826,35.052)
NetLED2_A: LED2.A R2.P$1 | length 1.3
  Bottom w0.15: LED2.A@34.087,61.189 34.341,60.96 R2.P$1@34.341,59.969
NetLED6001_A: LED6001.A R6003.P$1 | length 1.1
  Bottom w0.15: R6003.P$1@58.903,53.162 58.903,53.95 58.852,54 58.953,54.102 LED6001.A@58.928,54.153
NetLED6002_A: LED6002.A R6004.P$1 | length 1.3
  Bottom w0.15: R6004.P$1@57.785,48.92 58.318,48.92 58.852,49.454 LED6002.A@58.903,49.454
NetLED6003_A: LED6003.A R6005.P$1 | length 0.7
  Bottom w0.15: LED6003.A@58.801,36.144 R6005.P$1@58.801,36.83
NetLED6004_A: LED6004.A R6006.P$1 | length 0.8
  Bottom w0.15: R6006.P$1@51.181,29.083 51.283,29.185 LED6004.A@51.968,29.185
NetLED6005_A: LED6005.A R6007.P$1 | length 0.7
  Bottom w0.15: R6007.P$1@42.545,29.083 42.647,29.185 LED6005.A@43.231,29.185
NetLED6006_A: LED6006.A R6008.P$1 | length 0.8
  Bottom w0.15: LED6006.A@33.452,29.185 33.553,29.083 R6008.P$1@34.239,29.083
NetLED6007_A: LED6007.A R6009.P$1 | length 1
  Bottom w0.15: R6009.P$1@26.797,36.525 26.924,36.424 LED6007.A@26.924,35.839 26.924,35.611 26.949,35.585 LED6007.A@26.949,35.56
NetLED6008_A: LED6008.A R6010.P$1 | length 0.7
  Bottom w0.15: LED6008.A@26.899,46.711 R6010.P$1@26.899,47.396
NetLED6009_A: LED6009.A R6011.P$1 | length 0.7
  Bottom w0.15: R6011.P$1@26.899,54.28 LED6009.A@26.899,54.966
NetLED6010_C: LED6010.C R6012.P$2 | length 0.9
  Bottom w0.15: LED6010.C@31.75,61.189 31.75,60.325 R6012.P$2@31.775,60.274
NetLED6011_C: LED6011.C R6014.P$2 | length 1.4
  Bottom w0.15: R6014.P$2@51.486,59.385 51.486,60.173 51.765,60.452 51.994,60.452
NetQ5001_B: Q5001.B R5002.P$1 | length 2.9
  Top w0.15: Q5001.B@29.997,54.61 30.023,54.635 Q5001.B@30.023,54.712
  Top w0.406: R5002.P$1@28.727,56.921 28.753,56.921 30.023,55.651 Q5001.B@30.023,54.712
NetQ5001_C: Q5001.C R5003.2 | length 5.9
  Top w0.15: Q5001.C@31.166,57.074 31.064,56.998 31.064,56.921 31.166,56.82 31.166,56.515 31.877,55.804 32.69,55.804 33.096,56.21 R5003.2@33.274,56.21 ; R5003.2@32.842,55.804 R5003.2@33.045,56.007
  Top w0.254: Q5001.C@30.963,56.921 30.963,56.769 31.928,55.804 32.69,55.804 R5003.2@32.842,55.804
NetQ6001_1: Q6001.1 R6001.P$1 R6002.P$1 | length 7.5
  Top w0.15: Q6001.1@33.02,60.528 33.02,60.706 33.198,60.884 33.884,60.884 ; Q6001.1@33.401,60.833 33.934,60.833 ; R6002.P$1@35.662,60.884 33.884,60.884 ; R6001.P$1@35.763,58.141 35.763,58.344 35.433,58.649 34.519,58.649 34.214,58.953 34.214,60.579 33.96,60.833 33.934,60.833 ; 33.884,60.884 33.934,60.833
NetR1001_P$1: R1001.P$1 U1001.69 | length 2.3
  Top w0.15: U1001.69@49.657,52.73 49.708,52.73 50.749,53.772 v1(50.902,53.772)
  Bottom w0.15: v1(50.902,53.772) 50.902,53.924 50.978,54 R1001.P$1@51.384,54
NetR2001_P$1: R2001.P$1 R2002.P$2 | length 0.9
  Bottom w0.15: R2002.P$2@28.829,35.992 R2001.P$1@28.829,36.906
NetR6012_P$1: R6012.P$1 R6013.P$2 | length 1.5
  Bottom w0.15: R6012.P$1@31.775,59.284 31.902,59.284 R6013.P$2@32.893,60.274
NetR6014_P$1: R6014.P$1 R6015.P$2 | length 1.9
  Bottom w0.15: R6015.P$2@51.486,57.633 51.486,58 52.396,58.91 R6014.P$1@52.396,59.203
NetR7003_P$1: R7003.P$1 R7013.P$1 U7001.12 | length 49.2
  Top w0.15: v2(26.441,39.37) 26.746,39.675 U7001.12@26.772,39.675 ; v4(31.369,37.592) 31.369,37.363 R7013.P$1@31.574,37.158
  HorizontalTop w0.15: v2(26.441,39.37) 26.441,39.161 27.092,38.511 27.809,38.511 29.574,36.745 30.801,36.745 31.369,37.313 v4(31.369,37.592) ; v2(27.711,54.737) 27.762,54.788 29.54,54.788 31.166,53.162 38.602,53.162 38.853,52.911 42.801,52.911 43.358,53.467 46.634,53.467 47.65,52.451 v1(47.777,52.451)
  Verticall_top w0.15: v2(26.441,39.37) 26.467,39.37 26.772,39.675 26.772,39.573 26.695,39.497 26.695,49.022 27.711,50.038 v2(27.711,54.737)
  Bottom w0.15: v1(47.777,52.451) 48.082,52.172 R7003.P$1@51.384,52.172
NetR7004_P$1: R7004.P$1 U7001.13 | length 36.9
  Top w0.15: U7001.13@26.772,37.211 26.822,37.211 27.356,37.744 v1(27.661,37.744) 27.33,37.744 27.254,37.668
  HorizontalTop w0.15: v2(31.75,49.682) 31.818,49.751 36.813,49.751 37.262,49.301 38.659,49.301 39.268,49.911 44.221,49.911 44.475,49.657 44.983,49.657 45.618,50.292 47.396,50.292 48.158,51.054 v1(48.666,51.054)
  Verticall_top w0.15: v1(27.661,37.744) 27.788,37.744 28.016,37.973 28.067,37.973 28.829,38.735 28.829,39.853 29.032,40.056 29.032,40.869 28.626,41.275 28.626,46.253 30.154,47.782 30.541,47.782 31.75,48.991 v2(31.75,49.682)
  Bottom w0.15: v1(48.666,51.054) 49.403,50.343 R7004.P$1@51.384,50.343
NetR7010_P$1: R7010.P$1 U7001.42 | length 4.2
  Top w0.15: R7010.P$1@34.798,45.068 34.798,43.524 35.663,42.66 35.663,41.857 U7001.42@35.239,41.433
NetR7011_P$1: R7011.P$1 U7001.43 | length 4.4
  Top w0.15: R7011.P$1@33.909,45.068 33.723,44.882 33.884,44.882 33.884,44.776 34.122,44.776 34.496,44.402 34.496,43.399 35.306,42.589 35.306,42.213 U7001.43@34.882,41.789
NetR7012_P$1: R7012.P$1 U7001.25 | length 1.8
  Top w0.15: R7012.P$1@33.037,31.547 33.037,33.197 U7001.25@33.116,33.276
NetR10001_P$2: R10001.P$2 U10001.7 | length 5.2
  Top w0.15: U10001.7@53.569,54.762 53.569,54.432 54.254,53.721 54.889,53.721 v1(55.27,54.102)
  Bottom w0.254: v1(55.27,54.102) 56.007,53.365 56.058,53.365 56.058,51.841 R10001.P$2@56.185,51.841
NetRN3001_1: RN3001.1 U3002.20 | length 3
  Bottom w0.15: RN3001.1@46.406,36.83 46.787,36.83 47.396,36.195 47.396,34.519 U3002.20@47.422,34.493
NetRN3001_2: RN3001.2 U3002.18 | length 1.6
  Bottom w0.15: RN3001.2@45.923,36.83 45.898,36.83 45.898,36.5 46.431,35.992 U3002.18@46.431,35.509
NetRN3001_3: RN3001.3 U3002.17 | length 1.5
  Bottom w0.15: RN3001.3@45.415,36.83 45.415,36.5 45.923,35.992 U3002.17@45.923,35.509
NetRN3001_4: RN3001.4 U3002.16 | length 1.5
  Bottom w0.15: RN3001.4@44.907,36.83 44.907,36.5 45.441,35.966 U3002.16@45.441,35.509
NetRN3001_5: RN3001.5 U3002.15 | length 1.5
  Bottom w0.15: RN3001.5@44.425,36.83 44.425,36.474 44.933,35.966 U3002.15@44.933,35.509
NetRN3001_6: RN3001.6 U3002.14 | length 1.5
  Bottom w0.15: RN3001.6@43.917,36.83 43.917,36.474 44.425,35.966 U3002.14@44.425,35.509
NetRN3001_7: RN3001.7 U3002.13 | length 1.5
  Bottom w0.15: RN3001.7@43.409,36.83 43.409,36.474 43.942,35.941 U3002.13@43.942,35.509
NetRN3001_8: RN3001.8 U3002.12 | length 1.5
  Bottom w0.15: RN3001.8@42.926,36.83 42.926,36.017 U3002.12@43.434,35.509
NetRN3002_1: RN3002.1 U3001.20 | length 3.2
  Bottom w0.15: RN3002.1@51.892,36.703 51.841,36.779 51.841,36.805 52.019,36.805 52.299,36.5 52.4,36.5 52.908,35.992 52.908,34.544 52.959,34.493 U3001.20@52.857,34.595
NetRN3002_2: RN3002.2 U3001.18 | length 2.1
  Bottom w0.15: RN3002.2@51.333,36.805 51.333,36.601 51.333,36.576 51.333,36.525 51.537,36.322 51.791,36.322 51.968,36.144 51.968,35.509 51.968,35.941
NetRN3002_3: RN3002.3 U3001.17 | length 1.6
  Bottom w0.15: RN3002.3@50.825,36.805 50.825,36.601 51.46,35.941 U3001.17@51.46,35.509
NetRN3002_4: RN3002.4 U3001.16 | length 1.6
  Bottom w0.15: RN3002.4@50.343,36.805 50.343,36.576 50.952,35.941 50.952,35.509 U3001.16@50.978,35.509
NetRN3002_5: RN3002.5 U3001.15 | length 1.6
  Bottom w0.15: RN3002.5@49.835,36.805 49.835,36.576 50.444,35.966 50.444,35.509 U3001.15@50.47,35.509
NetRN3002_6: RN3002.6 U3001.14 | length 1.6
  Bottom w0.15: RN3002.6@49.327,36.805 49.327,36.601 49.936,35.992 49.936,35.535 U3001.14@49.962,35.509
NetRN3002_7: RN3002.7 U3001.13 | length 1.8
  Bottom w0.15: RN3002.7@48.819,36.817 48.819,36.322 48.92,36.22 49.225,36.22 49.428,36.017 49.428,35.535 U3001.13@49.479,35.509
NetRN3002_8: RN3002.8 U3001.12 | length 1.6
  Bottom w0.15: RN3002.8@48.336,36.805 48.336,36.144 U3001.12@48.971,35.509
NetRN8001_1: RN8001.1 U8002.21 | length 1.6
  Bottom w0.15: U8002.21@34.815,35.484 34.815,35.958 35.456,36.599 RN8001.1@35.456,36.867
NetRN8001_2: RN8001.2 U8002.20 | length 1.7
  Bottom w0.15: U8002.20@34.307,35.484 34.307,36.018 34.809,36.52 34.809,36.754 34.842,36.754 RN8001.2@34.956,36.867
NetRN8001_3: RN8001.3 U8002.19 | length 1.7
  Bottom w0.15: U8002.19@33.803,35.484 33.803,36.014 34.456,36.667 RN8001.3@34.456,36.867
NetRN8001_4: RN8001.4 U8002.18 | length 1.7
  Bottom w0.15: U8002.18@33.303,35.484 33.303,36.018 33.956,36.671 RN8001.4@33.956,36.867
NetRN8001_5: RN8001.5 U8002.17 | length 1.7
  Bottom w0.15: U8002.17@32.803,35.484 32.803,36.026 33.452,36.675 RN8001.5@33.452,36.867
NetRN8001_6: RN8001.6 U8002.16 | length 1.6
  Bottom w0.15: U8002.16@32.303,35.484 32.303,36.012 32.944,36.652 RN8001.6@32.944,36.867
NetRN8001_7: RN8001.7 U8002.15 | length 1.6
  Bottom w0.15: U8002.15@31.803,35.484 31.803,35.939 32.436,36.572 RN8001.7@32.436,36.867
NetRN8001_8: RN8001.8 U8002.14 | length 1.7
  Bottom w0.15: U8002.14@31.303,35.484 31.303,35.875 31.953,36.525 RN8001.8@31.953,36.867
NetRN8002_1: RN8002.1 U8001.20 | length 3.9
  Bottom w0.15: RN8002.1@40.968,36.842 41.187,36.842 41.529,36.5 42.316,36.5 42.545,36.271 42.545,35.687 42.037,35.179 42.037,34.671 42.012,34.671 U8001.20@41.834,34.493
NetRN8002_2: RN8002.2 U8001.18 | length 1.5
  Bottom w0.15: RN8002.2@40.462,36.83 40.513,36.779 40.513,36.5 40.843,36.195 U8001.18@40.843,35.509
NetRN8002_3: RN8002.3 U8001.17 | length 1.5
  Bottom w0.15: RN8002.3@39.954,36.83 40.005,36.779 40.005,36.5 40.335,36.195 U8001.17@40.335,35.509
NetRN8002_4: RN8002.4 U8001.16 | length 1.5
  Bottom w0.15: RN8002.4@39.472,36.83 39.497,36.805 39.497,36.5 39.853,36.17 U8001.16@39.853,35.509
NetRN8002_5: RN8002.5 U8001.15 | length 1.5
  Bottom w0.15: RN8002.5@38.964,36.83 38.989,36.805 38.989,36.5 39.345,36.17 U8001.15@39.345,35.509
NetRN8002_6: RN8002.6 U8001.14 | length 1.5
  Bottom w0.15: RN8002.6@38.456,36.83 38.481,36.805 38.481,36.5 38.837,36.17 U8001.14@38.837,35.509
NetRN8002_7: RN8002.7 U8001.13 | length 1.5
  Bottom w0.15: RN8002.7@37.973,36.83 37.973,36.805 37.973,36.5 38.354,36.144 U8001.13@38.354,35.509
NetRN8002_8: RN8002.8 U8001.12 | length 1.5
  Bottom w0.15: RN8002.8@37.465,36.83 37.465,36.5 37.846,36.144 U8001.12@37.846,35.509
OTG_FS_N: U1001.70 U2001.6 | length 6.9
  Top w0.15: U2001.6@48.514,58.141 49.733,58.141 49.911,57.963 49.911,57.238 50.063,57.085 50.063,55.94 49.911,55.788 49.911,55.063 50.135,54.839 50.135,54.127 49.911,53.903 49.911,53.696 U1001.70@49.301,53.086
OTG_FS_P: U1001.71 U2001.4 | length 5.1
  Top w0.15: U2001.4@48.438,57.125 U2001.4@48.514,57.125 49.298,57.125 49.505,56.918 49.505,56.673 49.602,56.576 49.602,56.2 49.505,56.103 49.505,54.895 49.729,54.671 49.729,54.295 49.505,54.071 49.505,54 U1001.71@48.946,53.442
OTG_N: J2001.D- U2001.1 U$9001.33 | length 25.7
  Top w0.15: v4@43.561,57.15 43.713,56.998 46.009,56.998 46.698,57.687 46.698,57.879 46.831,58.011 47.032,58.011 U2001.1@47.153,58.133 ; v4@43.561,57.239 J2001.D-@43.561,58.445
  Verticall_top w0.15: v4(43.558,57.236) 43.558,54.562 45.009,53.111 45.009,49.657 45.847,48.819 45.847,48.438 46.787,47.498 46.787,43.088 46.244,42.545 v8(45.949,42.545)
  Bottom w0.15: U$9001.33@44.473,45.314 44.473,43.462 45.39,42.545 v8(45.949,42.545)
OTG_P: J2001.D+ U2001.3 U$9001.31 | length 25.7
  Top w0.15: v4@42.901,57.239 J2001.D+@42.901,58.445 ; v4(42.904,57.236) 42.904,57.14 43.503,56.54 46.152,56.54 46.38,56.769 47.523,56.769 47.676,56.921 47.676,57.048 47.6,57.125 U2001.3@47.153,57.125
  Verticall_top w0.15: v4(42.904,57.236) 42.904,54.515 44.602,52.816 44.602,49.489 45.441,48.65 45.441,48.092 46.38,47.152 46.38,43.434 v8(46.152,43.205)
  Bottom w0.15: U$9001.31@44.973,45.314 44.973,43.749 45.517,43.205 v8(46.152,43.205)
PB2-BOOT1: R1002.P$1 U1001.37 | length 2.3
  Top w0.15: U1001.37@51.41,38.938 51.968,38.379 v1(51.968,37.592)
  Bottom w0.15: v1(51.968,37.592) 52.349,37.211 R1002.P$1@52.527,37.211
PPM-SBUS-PROT: RN8002.10 U$9001.62 | length 2
  Bottom w0.15: U$9001.62@37.465,40.107 37.465,40.081 37.465,39.141 37.948,38.684 RN8002.10@37.948,38.354 RN8002.10@37.973,38.329
PPM_INPUT: D8001.C U7001.29 U8001.8 U8003.2 | length 15.7
  Top w0.15: U7001.29@34.544,34.722 35.149,34.117 35.149,31.213 36.239,30.122 36.554,30.122 36.909,30.478 37.22,30.478 37.412,30.286 37.412,30.103 37.517,29.997 38.278,29.997 38.379,30.099 v1(38.379,30.124)
  Bottom w0.15: 38.354,31.547 38.354,32.004 38.379,31.953 v1@38.379,30.201 ; v1(38.379,30.124) v1@38.379,30.201 ; U8003.2@39.751,30.226 39.751,30.201 39.091,30.201 ; D8001.C@41.707,31.013 41.58,31.013 41.427,31.14 41.427,31.318 39.192,31.318 39.014,31.14 39.014,30.277 39.091,30.201 ; v1@38.379,30.201 39.091,30.201
PRESSURE_SENS: RN2002.5 U1001.34 | length 12.3
  Top w0.15: v2(45.491,30.988) 45.542,30.963 RN2002.5@45.542,30.48 ; U1001.34@50.368,37.871 51.587,36.627 v2(51.587,34.544)
  Verticall_top w0.15: v2(45.491,30.988) 45.491,31.171 47.645,33.325 49.549,33.325 49.801,33.073 50.249,33.073 51.587,34.412 v2(51.587,34.544)
PRESSURE_SENS_IN: RN2002.12 U$9001.21 | length 20.2
  Top w0.15: v1(44.831,31.14) 45.136,31.42 45.288,31.42 45.542,31.674 RN2002.12@45.542,31.979
  VerticalBot w0.15: v1(44.831,31.14) 44.831,30.785 45.11,30.48 47.269,30.48 47.523,30.734 47.523,30.754 47.223,31.054 47.223,31.43 47.523,31.73 47.523,33.68 48.539,34.696 48.539,35.865 48.539,37.846 48.285,38.1 48.285,43.561 v3(47.523,44.323)
  Bottom w0.15: U$9001.21@47.473,45.288 47.473,44.399 v3(47.523,44.323)
PROT_SPARE_1: RN3002.16 U$9001.8 | length 2.2
  Bottom w0.15: U$9001.8@50.978,40.107 50.978,39.497 51.841,38.608 51.841,38.329 RN3002.16@51.841,38.303